# Altium PCB Dock_Chrgr.PcbDoc (part 1 of 2)
Units mil, origin at the board's own origin, x right, y up, seen from the top; angles counter-clockwise.
Board outline 3937.01 x 1574.8 mil, 2 copper layers (Top Layer, Bottom Layer); 76 components, 49 nets, 210 pads, 119 vias.
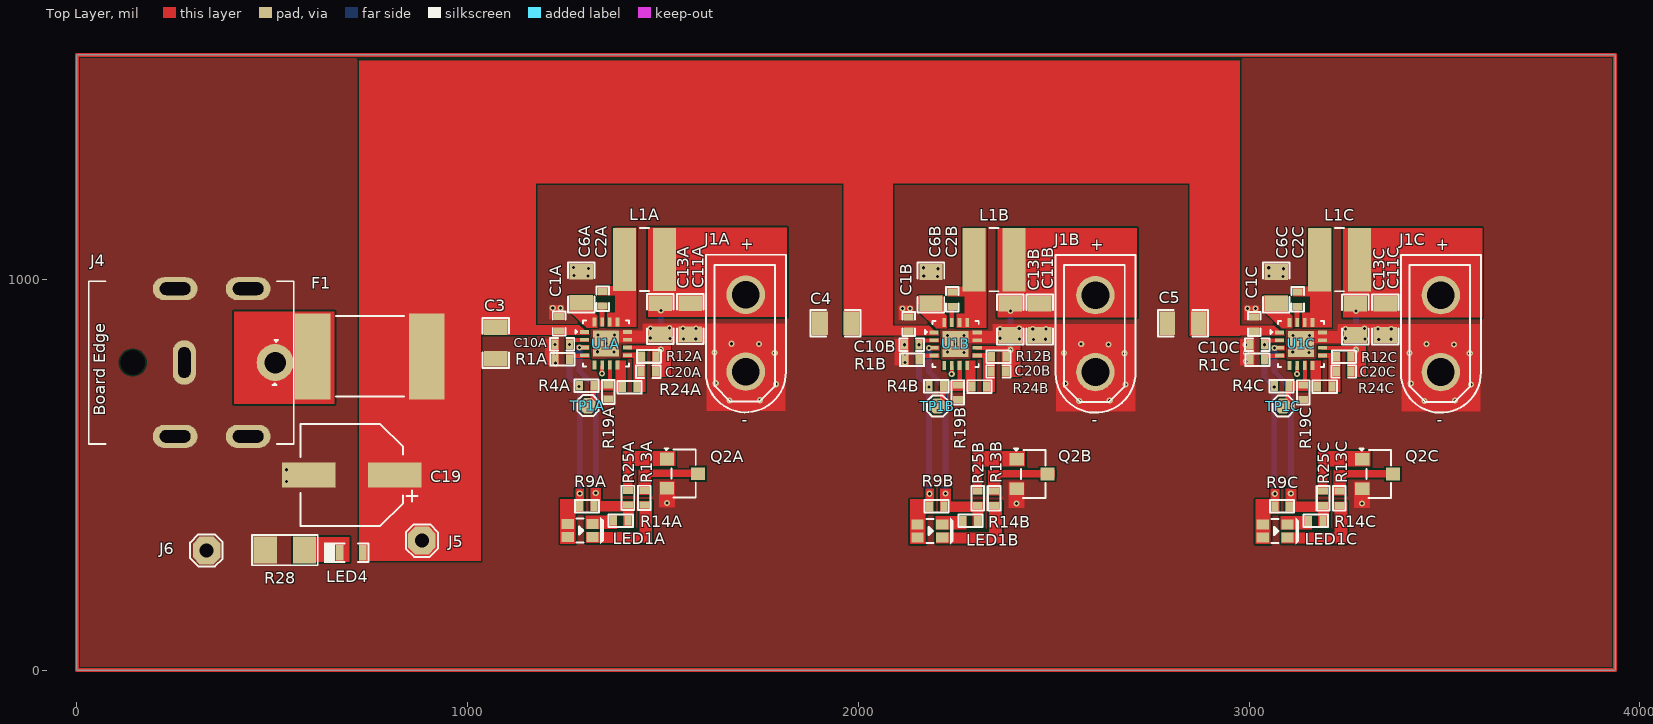
[diagram p0: Top Layer view]
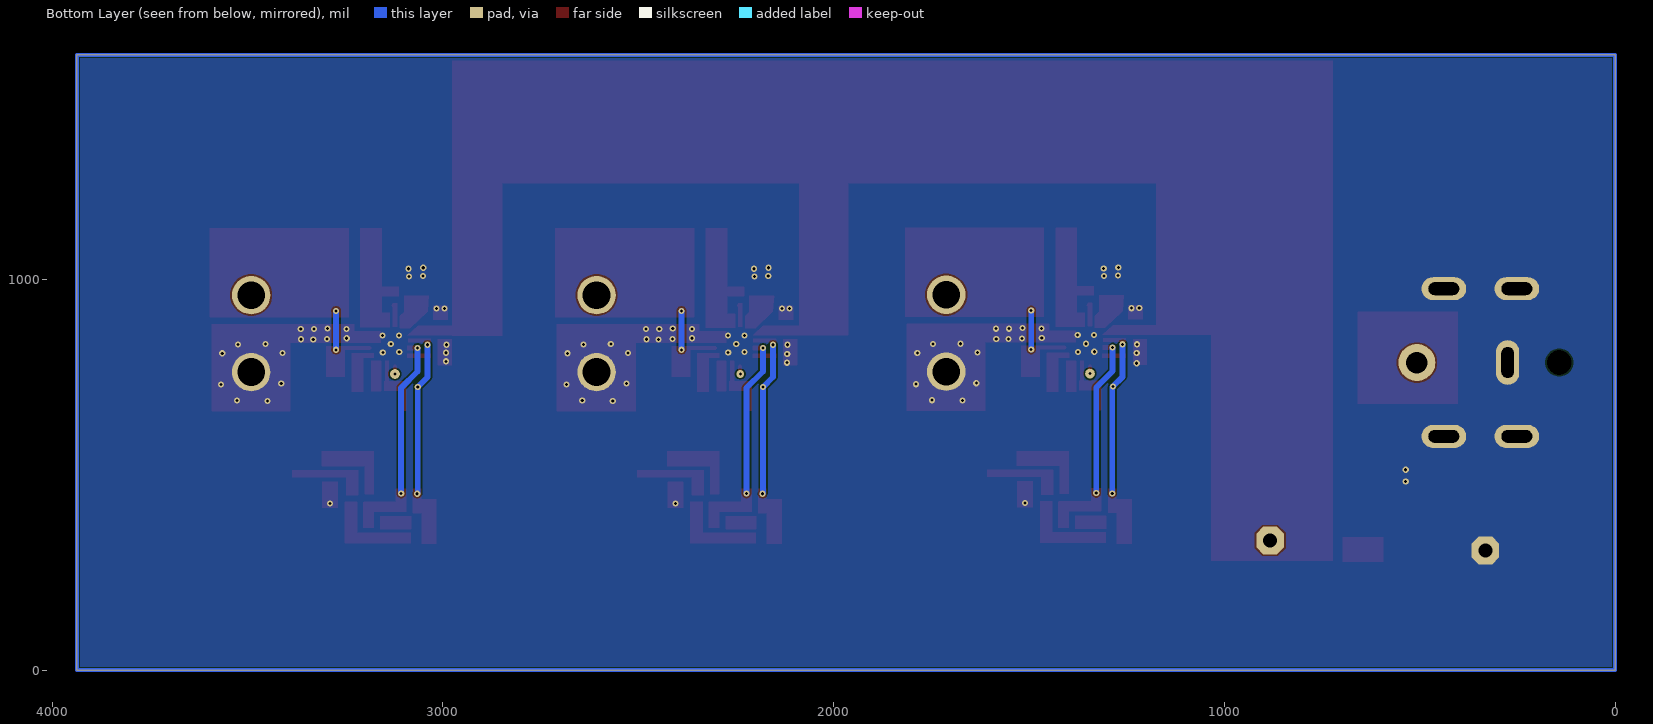
[diagram p1: Bottom Layer view, seen from below]
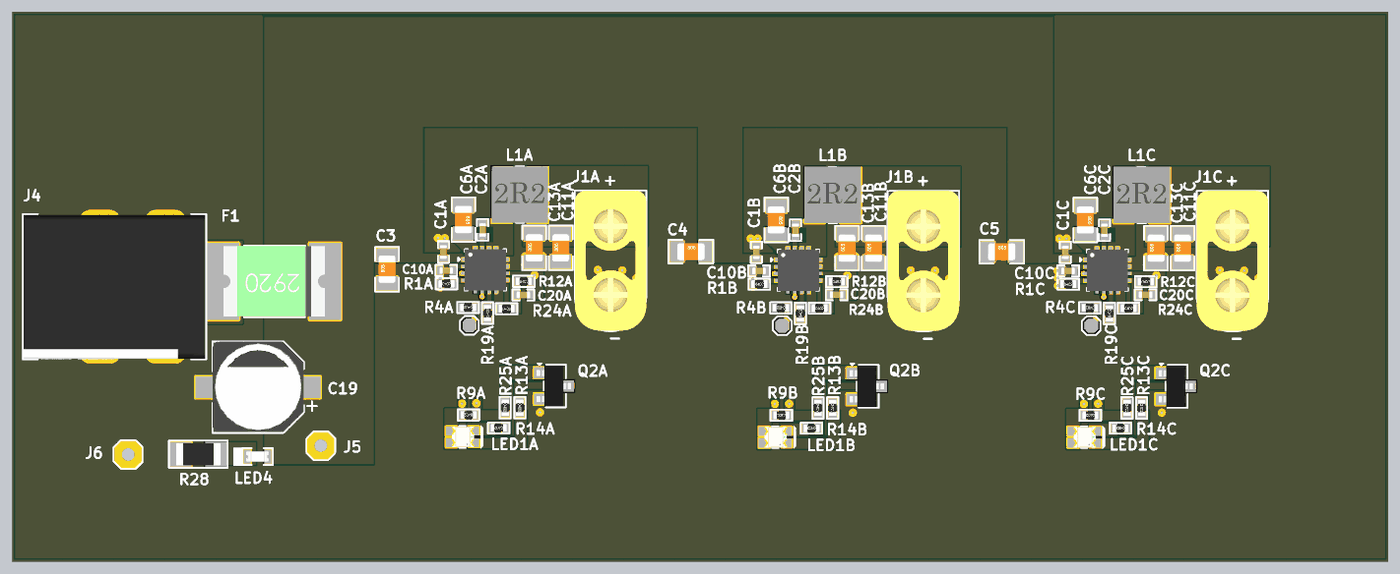
[diagram p2: 3D render of the assembled board from above, using the file's embedded part models]

## Layer stack, top to bottom
Top Solder: solder mask 0.4, Solder Resist, Dk 3.5
Top Layer: signal copper 1.4
Dielectric 1: dielectric 12.6, FR-4, Dk 4.8
Bottom Layer: signal copper 1.4
Bottom Solder: solder mask 0.4, Solder Resist, Dk 3.5

## Board outline
0,0 0,1574.8 3937.01,1574.8 3937.01,0

## Design rules (kind name [scope] priority, off if disabled: settings)
Clearance [All] p1: gap=4 ignorepadtopadclearanceinfootprint=FALSE except(0: Arc-Hole Track-Hole SMDPad-Hole THPad-Hole Via-Hole Fill-Hole Poly-Hole Region-Hole Text-Hole)
MinimumSolderMaskSliver [All] p1: minsoldermaskwidth=0
PolygonConnect [All] p1: connectstyle=Direct reliefconductorwidth=10 reliefentries=4 polygonreliefangle="90 Angle" airgapwidth=10
RoomDefinition U_Charger_Sheet11 [InComponentClass('U_Charger_Sheet11')] p1: confinementstyle=ConfineIn formatcopy=TRUE lockcomponents=FALSE outline 1093,1205.5 1909,1205.5 1909,258 1093,258
RoomDefinition U_Charger_Sheet12 [InComponentClass('U_Charger_Sheet12')] p2: confinementstyle=ConfineIn formatcopy=TRUE lockcomponents=FALSE outline 1988,1204.5 2804,1204.5 2804,257 1988,257
RoomDefinition U_Charger_Sheet13 [InComponentClass('U_Charger_Sheet13')] p3: confinementstyle=ConfineIn formatcopy=TRUE lockcomponents=FALSE outline 2872,1204.5 3688,1204.5 3688,257 2872,257
RoutingVias [All] p1: holewidth=28 width=50 viastyle="Through Hole" minholewidth=28 minwidth=50 maxholewidth=28 maxwidth=50
SilkToSilkClearance [All] p1: silktosilkclearance=0
SilkToSolderMaskClearance [IsPad] p1: minsilkscreentomaskgap=0.5 clearancetoexposedcopper=TRUE
SolderMaskExpansion [All] p1: expansion=4 istentingtop=FALSE
Width [All] p1: maxlimit=100 minlimit=4 preferedwidth=10 minimp=50.000000 maximp=50.000000 favimp=50.000000
27 further rules are at their usual default settings.

## Classes and differential pairs
channel class Charger_Sheet1: U_Charger_Sheet11 U_Charger_Sheet12 U_Charger_Sheet13
component class U_Charger_Sheet13: C1C C2C C6C C10C C11C C13C C20C J1C L1C LED1C Q2C R1C R4C R9C R12C R13C R14C R19C R24C R25C TP1C U1C
component class U_Charger_Sheet12: C1B C2B C6B C10B C11B C13B C20B J1B L1B LED1B Q2B R1B R4B R9B R12B R13B R14B R19B R24B R25B TP1B U1B
component class "U_Power input_Sheet": C3 C4 C5 C19 F1 J5 J6 LED4 R28
component class U_Charger_Sheet11: C1A C2A C6A C10A C11A C13A C20A J1A L1A LED1A Q2A R1A R4A R9A R12A R13A R14A R19A R24A R25A TP1A U1A

## Components (designator, comment, footprint, x,y, rotation, side; value= is the part's Value field where it differs from the comment)
C1A "2.2uf" Cap-0402 1234,887 r270 top (schematic designator C1)
C1B "2.2uf" Cap-0402 2129,886 r270 top (schematic designator C1)
C1C "2.2uf" Cap-0402 3013,886 r270 top (schematic designator C1)
C2A "47nF" Cap-0402 1346,950.5 r90 top (schematic designator C2)
C2B "47nF" Cap-0402 2241,949.5 r90 top (schematic designator C2)
C2C "47nF" Cap-0402 3125,949.5 r90 top (schematic designator C2)
C3 "22uF" Cap-0805 1072.5,837.5 r90 top
C4 "22uF" Cap-0805 1942,888 r0 top
C5 "22uF" Cap-0805 2831,887.5 r0 top
C6A "10uF" Cap-0805 1291,980 r270 top (schematic designator C6)
C6B "10uF" Cap-0805 2186,979 r270 top (schematic designator C6)
C6C "10uF" Cap-0805 3070,979 r270 top (schematic designator C6)
C10A "2.2uF" Cap-0402 1242,834 r180 top (schematic designator C10)
C10B "2.2uF" Cap-0402 2137,833 r180 top (schematic designator C10)
C10C "2.2uF" Cap-0402 3021,833 r180 top (schematic designator C10)
C11A "10uF" Cap-0805 1569.5,899 r90 top (schematic designator C11)
C11B "10uF" Cap-0805 2464.5,898 r90 top (schematic designator C11)
C11C "10uF" Cap-0805 3348.5,898 r90 top (schematic designator C11)
C13A "10uF" Cap-0805 1493.5,899 r90 top (schematic designator C13)
C13B "10uF" Cap-0805 2388.5,898 r90 top (schematic designator C13)
C13C "10uF" Cap-0805 3272.5,898 r90 top (schematic designator C13)
C19 "100uF" RVT1H101M0607 703.5,499.5 r180 top
C20A "470pF" Cap-0402 1462.5,764 r0 top (schematic designator C20)
C20B "470pF" Cap-0402 2358.5,764.5 r0 top (schematic designator C20)
C20C "470pF" Cap-0402 3242.5,764.5 r0 top (schematic designator C20)
F1 "SHV2920P500-30-AA" Fuse-2920 749.5,803 r0 top
J1A "XT30UPB-M" XT30UPB-M 1712,862.5 r90 top (schematic designator J1)
J1B "XT30UPB-M" XT30UPB-M 2607,861.5 r90 top (schematic designator J1)
J1C "XT30UPB-M" XT30UPB-M 3491,861.5 r90 top (schematic designator J1)
J4 "DC-053D-25A" DC-053D-25A 325.2,787.4 r90 top
J5 "Test Point -TH 1.8mm Hole size 0.92mm" "Test Point -TH 1.8mm Hole size 0.92mm" 883,332 r180 top
J6 "Test Point -TH 1.8mm Hole size 0.92mm" "Test Point -TH 1.8mm Hole size 0.92mm" 332,306.5 r90 top
L1A "2.2uH" XRTC404030S2R2MGCA 1452.5,1051.5 r0 top (schematic designator L1)
L1B "2.2uH" XRTC404030S2R2MGCA 2347.5,1050.5 r0 top (schematic designator L1)
L1C "2.2uH" XRTC404030S2R2MGCA 3231.5,1050.5 r0 top (schematic designator L1)
LED1A "Red,Blue" XL-1615SURUBC 1288.01,357.26 r180 top (schematic designator LED1)
LED1B "Red,Blue" XL-1615SURUBC 2183.01,356.26 r180 top (schematic designator LED1)
LED1C "Red,Blue" XL-1615SURUBC 3067.01,356.26 r180 top (schematic designator LED1)
LED4 "RED" LED-0603 702,300.5 r180 top
Q2A "YJL2302B" SOT-23-3L_ 1550,503 r270 top (schematic designator Q2)
Q2B "YJL2302B" SOT-23-3L_ 2445,502 r270 top (schematic designator Q2)
Q2C "YJL2302B" SOT-23-3L_ 3329,502 r270 top (schematic designator Q2)
R1A "20K" Res-0402 1242.5,796 r0 top (schematic designator R1)
R1B "20K" Res-0402 2137.5,795 r0 top (schematic designator R1)
R1C "20K" Res-0402 3021.5,795 r0 top (schematic designator R1)
R4A "5.23K" Res-0402 1304.5,728 r180 top value=5.23kR (schematic designator R4)
R4B "5.23K" Res-0402 2199.5,727 r180 top value=5.23kR (schematic designator R4)
R4C "5.23K" Res-0402 3083.5,727 r180 top value=5.23kR (schematic designator R4)
R9A "10K" Res-0402 1305.5,420 r180 top (schematic designator R9)
R9B "10K" Res-0402 2200.5,419 r180 top (schematic designator R9)
R9C "10K" Res-0402 3084.5,419 r180 top (schematic designator R9)
R12A "1.33M" Res-0402 1464,803 r0 top (schematic designator R12)
R12B "1.33M" Res-0402 2359,802 r0 top (schematic designator R12)
R12C "1.33M" Res-0402 3243,802 r0 top (schematic designator R12)
R13A "270R" Res-0402 1452.5,441 r270 top (schematic designator R13)
R13B "270R" Res-0402 2347.5,440 r270 top (schematic designator R13)
R13C "270R" Res-0402 3231.5,440 r270 top (schematic designator R13)
R14A "560R" Res-0402 1392,383 r180 top (schematic designator R14)
R14B "560R" Res-0402 2287,382 r180 top (schematic designator R14)
R14C "560R" Res-0402 3171,382 r180 top (schematic designator R14)
R19A "7.87K" Res-0402 1360,712 r90 top value=7.87kR (schematic designator R19)
R19B "7.87K" Res-0402 2255,711 r90 top value=7.87kR (schematic designator R19)
R19C "7.87K" Res-0402 3139,711 r90 top value=7.87kR (schematic designator R19)
R24A "200K" Res-0402 1414.5,724.5 r0 top (schematic designator R24)
R24B "200K" Res-0402 2310,726 r0 top (schematic designator R24)
R24C "200K" Res-0402 3194,726 r0 top (schematic designator R24)
R25A "1K" Res-0402 1410.5,441 r270 top (schematic designator R25)
R25B "1K" Res-0402 2305.5,440 r270 top (schematic designator R25)
R25C "1K" Res-0402 3189.5,440 r270 top (schematic designator R25)
R28 "1K" Res-1206 532.5,307.5 r0 top
TP1A "TEST POINT 0.5mm Dia" "Test-point - 0.5mm" 1308,677 r90 top (schematic designator TP1)
TP1B "TEST POINT 0.5mm Dia" "Test-point - 0.5mm" 2203,676 r90 top (schematic designator TP1)
TP1C "TEST POINT 0.5mm Dia" "Test-point - 0.5mm" 3087,676 r90 top (schematic designator TP1)
U1A "BQ25306RTER" "16-WQFN (3x3)" 1299.04,865.41 r0 top (schematic designator U1)
U1B "BQ25306RTER" "16-WQFN (3x3)" 2194.04,864.41 r0 top (schematic designator U1)
U1C "BQ25306RTER" "16-WQFN (3x3)" 3078.04,864.41 r0 top (schematic designator U1)

## Footprints (in the part's own frame and the unit in brackets; to place one, negate y for a bottom-side part, rotate by r counter-clockwise, add the part's x,y. Pads: shape width x height; smd on the part's side, far side on the other; paste and mask are expansions set on the pad)
"16-WQFN (3x3)" [mm]
  rect 0.6x0.24 smd mask+0.07: 1(0,0) 2(0,-0.5) 3(0,-1) 4(0,-1.5) 9(2.8,-1.5) 10(2.8,-1) 11(2.8,-0.5) 12(2.8,0)
  rect 0.24x0.6 smd mask+0.07: 5(0.65,-2.15) 6(1.15,-2.15) 7(1.65,-2.15) 8(2.15,-2.15) 13(2.15,0.65) 14(1.65,0.65) 15(1.15,0.65) 16(0.65,0.65)
  rect 1.68x1.68 smd mask+0.07: 17(1.4,-0.75)
  silkscreen extent -0.59,-2.25 2.9,0.75, body extent -0.1,-2.25 2.9,0.75, height 0.8
Cap-0402 [mil]
  rect 18x25 smd mask+2.36: 1(-18.5,0) 2(18.5,0)
  silkscreen extent -31,-16 31,16, body extent -20,-10 20,10, height 19
Cap-0805 [mil] "SMD 0805"
  rect 40x60 smd mask+2.76: 1(-40,0) 2(40,0)
  silkscreen extent -64,-34 64,34, body extent -39,-25 39,25, height 30
DC-053D-25A [mm]
  round 2.4 hole 1.4 mask+0.05: 1(0,-4.625)
  oval 2.9x1.5 hole 0.82 slot 2 at 0 deg mask+0.05: 2(0,1.275)
  oval 1.5x2.9 hole 0.82 slot 2 at 90 deg mask+0.05: 3(-4.8,-2.875) 3(-4.8,1.875) 3(4.8,-2.875) 3(4.8,1.875)
  round 0 hole 1.6 unplated mask+0.05: MH(0,4.625)
  silkscreen extent -5.28,-5.84 5.28,7.49, body extent -5.26,-5.78 5.25,7.42, height 10.2
Fuse-2920 [mm]
  rect 2.3x5.6 smd: 1(-3.7,0) 2(3.7,0)
  silkscreen extent -2.18,-2.62 2.24,2.62, body extent -3.68,-2.56 3.68,2.56, height 0.9
LED-0603 [mm]
  rect 0.5x1 smd: 1(-0.75,0) 2(0.75,0)
  silkscreen extent -1.12,-0.66 1.75,0.66, body extent -0.82,-0.37 0.82,0.36, height 0.68
Res-0402 [mil]
  rect 18x25 smd mask+2.17: 1(-18.5,0) 2(18.5,0)
  silkscreen extent -32,-17 32,16, body extent -23,-11 23,11, height 16
Res-1206 [mil]
  rect 60x70 smd: 1(-50,0) 2(50,0)
  silkscreen extent -84,-39 84,39, body extent -63,-31 63,31, height 24
RVT1H101M0607 [mm]
  rect 3.5x1.6 smd: 1(-2.8,0) 2(2.8,0)
  silkscreen extent -4.27,-3.33 3.32,3.33, body extent -3.31,-3.33 3.29,3.27, height 7.94
SOT-23-3L_ [mm]
  rect 0.82x0.92 smd: 1(-0.95,-1) 2(0.95,-1) 3(0,1)
  silkscreen extent -1.65,-1.17 1.56,0.86, body extent -1.5,-1.25 1.5,1.25, height 1.1
"Test Point -TH 1.8mm Hole size 0.92mm" [mm]
  oct 1.8x1.8 hole 0.92: 1(0,0)
  silkscreen extent -1.04,-1.04 1.04,1.07
"Test-point - 0.5mm" [mm]
  oct 1x1 smd: 1(0,0)
  silkscreen extent -0.68,-0.68 0.68,0.68
XL-1615SURUBC [mm]
  rect 0.8x0.65 smd: 1(-0.8,0.425) 2(-0.8,-0.425) 3(0.8,-0.425) 4(0.8,0.425)
  silkscreen extent -1.52,-0.86 0.23,0.86, body extent -0.85,-0.76 0.77,0.75, height 0.59
XRTC404030S2R2MGCA [mm]
  rect 1.5x4.1 smd: 1(-1.3,0) 2(1.3,0)
  silkscreen extent -0.3,-2.05 0.3,2.05, body extent -2.05,-2.05 2.05,2.05, height 3
XT30UPB-M [mm]
  round 2.5 hole 1.8 paste+0 mask+0.051: 1(-2.5,0) 2(2.5,0)
  silkscreen extent -5.14,-2.6 5.1,2.6, body extent -5.1,-2.6 5.1,2.6, height 10.7

## Part data
C1A C1B C1C: library part GRM155R61E225KE11D, "CAP CER 2.2UF 25V X5R 0402", Capacitance=2.2uF, Case Code (Imperial)=0402, Case Code (Metric)=1005, Dielectric=X5R, LCSC Part Number=C385032, Manufacturer=Murata, Max Operating Temperature=85°C, Min Operating Temperature=-55°C, Package Quantity=10000, Resistor Type=Ceramic, Tolerance=10%, Voltage Rating=25V, Case/Package=0402, Category="Ceramic Capacitors", ComponentLink1Description=http://www.mouser.com/ds/2/281/c02e-2905.pdf?src-supplier=Mouser, ComponentLink1URL=http://www.mouser.com/ds/2/281/c02e-2905.pdf?src-supplier=Mouser, ComponentLink2Description=http://search.murata.co.jp/Ceramy/image/img/A01X/G101/ENG/GRM155R61E225KE11-01.pdf?src-supplier=Digi-Key, ComponentLink2URL=http://search.murata.co.jp/Ceramy/image/img/A01X/G101/ENG/GRM155R61E225KE11-01.pdf?src-supplier=Digi-Key, ComponentLink3Description=http://search.murata.co.jp/Ceramy/image/img/A01X/partnumbering_e_01.pdf?src-supplier=Digi-Key, ComponentLink3URL=http://search.murata.co.jp/Ceramy/image/img/A01X/partnumbering_e_01.pdf?src-supplier=Digi-Key, ComponentLink4Description=http://psearch.en.murata.com/capacitor/product/GRM155R61E225KE11%23.pdf?src-supplier=Avnet, ComponentLink4URL=http://psearch.en.murata.com/capacitor/product/GRM155R61E225KE11%23.pdf?src-supplier=Avnet, Height=0.5mm, Item Type=Capacitor, Lead Free="Lead Free", Length=1mm, Manufacturer Part Number=GRM155R61E225KE11D, Material=Ceramic, Mount="Surface Mount", Packaging="Tape and Reel", Pricing 1="10000=0.03830, 20000=0.03623, 40000=0.03416, 60000=0.03209, 80000=0.03002, 100000=0.02795, 1000000=0.02588 (USD)", RoHS=Yes, RoHS Compliant=Yes, Stock 1=210000, Supplier 1=Avnet, Supplier Part Number 1=GRM155R61E225KE11D, Termination=SMD/SMT, Thickness=0.022inch, Voltage Rating (DC)=25V, Weight=0.000212oz, Width=0.5mm
C2A C2B C2C: library part GRM155R71E473KA88D, "CAP CER 0.047UF 25V X7R 0402", Case Code (Imperial)=0402, Case Code (Metric)=1005, Dielectric=X7R, LCSC Part Number=C77017, Manufacturer=Murata, Max Operating Temperature=125°C, Min Operating Temperature=-55°C, Package Quantity=1, Supplier Part Number 1=2478015P, Tolerance=10%, Voltage=25V, Case/Package=0402, Category="Ceramic Capacitors", ComponentLink1Description=https://datasheet.ciiva.com/34302/1856425-34302854.pdf?src-supplier=Jameco, ComponentLink1URL=https://datasheet.ciiva.com/34302/1856425-34302854.pdf?src-supplier=Jameco, ComponentLink2Description=https://datasheet.ciiva.com/131/grm155r71e473ka88-01-131494.pdf?src-supplier=Digi-Key, ComponentLink2URL=https://datasheet.ciiva.com/131/grm155r71e473ka88-01-131494.pdf?src-supplier=Digi-Key, ComponentLink3Description=https://datasheet.ciiva.com/18184/getdatasheetpartid-153136-18184712.pdf?src-supplier=Verical, ComponentLink3URL=https://datasheet.ciiva.com/18184/getdatasheetpartid-153136-18184712.pdf?src-supplier=Verical, ComponentLink4Description=https://datasheet.ciiva.com/29199/454180-da-01-en-vs-kondensator-0402-29199826.pdf?src-supplier=Conrad, ComponentLink4URL=https://datasheet.ciiva.com/29199/454180-da-01-en-vs-kondensator-0402-29199826.pdf?src-supplier=Conrad, ComponentLink5Description=https://datasheet.ciiva.com/14103/grmseries-highdielectrictype-eng-14103754.pdf?src-supplier=Distrelec, ComponentLink5URL=https://datasheet.ciiva.com/14103/grmseries-highdielectrictype-eng-14103754.pdf?src-supplier=Distrelec, ComponentLink6Description=https://datasheet.ciiva.com/7937/608985-7937623.pdf?src-supplier=Element14, ComponentLink6URL=https://datasheet.ciiva.com/7937/608985-7937623.pdf?src-supplier=Element14, ComponentLink7Description=https://datasheet.ciiva.com/131/grm155r71e473ka88-01-131493.pdf?src-supplier=Digi-Key, ComponentLink7URL=https://datasheet.ciiva.com/131/grm155r71e473ka88-01-131493.pdf?src-supplier=Digi-Key, ComponentLink8Description=https://datasheet.ciiva.com/131/grm155r71e473ka88-01-131492.pdf?src-supplier=Digi-Key, ComponentLink8URL=https://datasheet.ciiva.com/131/grm155r71e473ka88-01-131492.pdf?src-supplier=Digi-Key, ComponentLink9Description=https://datasheet.ciiva.com/5424/product-5424844.pdf?src-supplier=Mouser, ComponentLink9URL=https://datasheet.ciiva.com/5424/product-5424844.pdf?src-supplier=Mouser, ComponentLink10Description=https://datasheet.ciiva.com/2989/product-2989395.pdf?src-supplier=Avnet, ComponentLink10URL=https://datasheet.ciiva.com/2989/product-2989395.pdf?src-supplier=Avnet, ComponentLink11Description=https://datasheet.ciiva.com/16213/product-16213823.pdf?src-supplier=Future+Electronics, ComponentLink11URL=https://datasheet.ciiva.com/16213/product-16213823.pdf?src-supplier=Future+Electronics, Construction=Flat, Depth=0.5mm, Height=0.5mm, Item Type=Capacitor, Lead Free="Lead Free", Length=1mm, Manufacturer Part Number=GRM155R71E473KA88D, Material=Ceramic, Mounting Technology="Surface Mount", Packaging="Tape and Reel", Pins=2, Pricing 1="1000=0.00007, 8000=0.00900 (GBP)", Radiation Hardening=No, Reach SVHC Compliant=Yes, RoHS=Yes, RoHS Compliant=Yes, Series=GRM, Stock 1=10000, Supplier 1=Rs, Termination=SMD/SMT, Thickness=0.022inch, Voltage Rating=25V, Voltage Rating (DC)=25V, Width=0.02inch
C3 C4 C5: library part GRM21BR61E226ME44L, "CAP CER 22UF 25V X5R 0805", Case Code (Imperial)=0805, Case Code (Metric)=2012, Dielectric=X5R, LCSC Part Number=C86816, Manufacturer=Murata, Max Operating Temperature=85°C, Min Operating Temperature=-55°C, Package Quantity=3000, Resistor Type=Ceramic, Tolerance=20%, Voltage=25V, Capacitance=22uF, Case/Package=0805, Category="Ceramic Capacitors", ComponentLink1Description=https://datasheet.ciiva.com/22787/1747471-22787265.pdf?src-supplier=Farnell, ComponentLink1URL=https://datasheet.ciiva.com/22787/1747471-22787265.pdf?src-supplier=Farnell, ComponentLink2Description=https://datasheet.ciiva.com/7719/1747471-7719095.pdf?src-supplier=Element14, ComponentLink2URL=https://datasheet.ciiva.com/7719/1747471-7719095.pdf?src-supplier=Element14, ComponentLink3Description=https://datasheet.ciiva.com/28584/1747471-28584199.pdf?src-supplier=Element14, ComponentLink3URL=https://datasheet.ciiva.com/28584/1747471-28584199.pdf?src-supplier=Element14, Construction=Flat, Depth=1.25mm, Height=1.25mm, Item Type=Capacitor, Lead Free="Lead Free", Length=2mm, Manufacturer Part Number=GRM21BR61E226ME44L, Material=Ceramic, Mount="Surface Mount", Packaging="Tape and Reel", Pricing 1="1=0.45930, 10=0.35000, 25=0.33950, 50=0.26910, 100=0.22090, 250=0.21320, 500=0.16760, 1000=0.14640, 3000=0.11710, 6000=0.10550, 15000=0.10450 (USD)", REACH SVHC="No SVHC", RoHS=Yes, RoHS Compliant=Yes, Series=GRM, Stock 1=21193, Supplier 1="Arrow Electronics", Supplier Part Number 1=GRM21BR61E226ME44L, Termination=SMD/SMT, Thickness=0.057inch, Voltage Rating=25V, Voltage Rating (DC)=25V, Weight=0.000335oz, Width=1.25mm
C6A C6B C6C: library part CC0805KKX5R8BB106, "CAP CER 10UF 25V X5R 0805", Case Code (Imperial)=0805, Case Code (Metric)=2012, Dielectric=X5R, LCSC Part Number=C89831, Manufacturer=Yageo, Max Operating Temperature=85°C, Min Operating Temperature=-55°C, Resistor Type=Ceramic, Supplier Part Number 1=311-1869-1-ND, Tolerance=10%, Voltage Rating=25V, Capacitance=10uF, Case/Package=0805, Category="Ceramic Capacitors", ComponentLink1Description=http://www.mouser.com/ds/2/447/UPY-GPHC_X5R_4V-to-50V_25-1131599.pdf?src-supplier=Mouser, ComponentLink1URL=http://www.mouser.com/ds/2/447/UPY-GPHC_X5R_4V-to-50V_25-1131599.pdf?src-supplier=Mouser, ComponentLink2Description=http://www.yageo.com/documents/recent/UPY-GPHC_X5R_4V-to-50V_25.pdf?src-supplier=Digi-Key, ComponentLink2URL=http://www.yageo.com/documents/recent/UPY-GPHC_X5R_4V-to-50V_25.pdf?src-supplier=Digi-Key, Depth=1.25mm, Halogen Free="Halogen Free", Item Type=Capacitor, Lead Free="Lead Free", Length=0.079inch, Manufacturer Part Number=CC0805KKX5R8BB106, Mount="Surface Mount", Packaging="Tape and Reel", Pricing 1="1=0.31000, 10=0.21200, 50=0.14820, 100=0.12710, 500=0.09534, 1000=0.08050 (USD)", RoHS=Yes, RoHS Compliant=Yes, Series=CC, Stock 1=554290, Supplier 1=Digi-Key, Termination=SMD/SMT, Thickness=0.057inch, Voltage Rating (DC)=25V, Weight=0.000194oz, Width=0.049inch
C10A C10B C10C: library part GRM155R61C225KE11D, "CAP CER 2.2UF 16V X5R 0402", Case Code (Imperial)=0402, Case Code (Metric)=1005, LCSC Part Number=C88944, Manufacturer=Murata, Max Operating Temperature=85°C, Min Operating Temperature=-55°C, Tolerance=10%, Voltage Rating=16V, Case/Package=0402, ComponentLink1Description=http://www.mouser.com/ds/2/281/c02e-2905.pdf?src-supplier=Mouser, ComponentLink1URL=http://www.mouser.com/ds/2/281/c02e-2905.pdf?src-supplier=Mouser, ComponentLink2Description=https://datasheet.octopart.com/GRM155R61C225KE11D-Murata-datasheet-149522998.pdf?src-supplier=Newark, ComponentLink2URL=https://datasheet.octopart.com/GRM155R61C225KE11D-Murata-datasheet-149522998.pdf?src-supplier=Newark, ComponentLink3Description=https://datasheet.octopart.com/GRM155R61C225KE11D-Murata-datasheet-66001083.pdf?src-supplier=Future+Electronics, ComponentLink3URL=https://datasheet.octopart.com/GRM155R61C225KE11D-Murata-datasheet-66001083.pdf?src-supplier=Future+Electronics, ComponentLink4Description=https://search.murata.co.jp/Ceramy/image/img/A01X/G101/ENG/GRM155R61C225KE11-01.pdf?src-supplier=Digikey, ComponentLink4URL=https://search.murata.co.jp/Ceramy/image/img/A01X/G101/ENG/GRM155R61C225KE11-01.pdf?src-supplier=Digikey, ComponentLink5Description=https://datasheet.octopart.com/GRM155R61C225KE11D-Murata-datasheet-165579666.pdf?src-supplier=TME, ComponentLink5URL=https://datasheet.octopart.com/GRM155R61C225KE11D-Murata-datasheet-165579666.pdf?src-supplier=TME, Height=0.3mm, Item Type=Capacitors, Lead Free="Lead Free", Length=0.039inch, Manufacturer Part Number=GRM155R61C225KE11D, Material=Ceramic, Mounting Technology="Surface Mount", Packaging="Cut Tape", Pricing="10000=0.0294, 20000=0.0289, 30000=0.0287, 40000=0.0285, 50000=0.0279 (USD)", RoHS=Yes, RoHS Compliant=Yes, Series=GRM, Stock=80000, Supplier="Future Electronics", Thickness=0.022inch, Voltage Rating (DC)=16V, Width=0.02inch
C11A C11B C11C C13A C13B C13C: library part EMK212BB7106MG-T, "CAP CER 10UF 16V X7R 0805", Case Code (Imperial)=0805, Case Code (Metric)=2012, Dielectric=X7R, LCSC Part Number=C141287, Manufacturer="Taiyo Yuden", Max Operating Temperature=125°C, Min Operating Temperature=-55°C, Package Quantity=3000, Ratings=AEC-Q200, Resistor Type=Ceramic, Supplier Part Number 1=587-3319-1-ND, Tolerance=20%, Voltage Rating=16V, Capacitance=10uF, Case/Package=0805, Category="Ceramic Capacitors", ComponentLink1Description=https://datasheet.ciiva.com/24393/472emk212bb7106mg-t-24393497.pdf?src-supplier=Onlinecomponents.com, ComponentLink1URL=https://datasheet.ciiva.com/24393/472emk212bb7106mg-t-24393497.pdf?src-supplier=Onlinecomponents.com, ComponentLink2Description=https://datasheet.ciiva.com/30229/379emk212bb7106mg-t-30229719.pdf?src-supplier=Onlinecomponents.com, ComponentLink2URL=https://datasheet.ciiva.com/30229/379emk212bb7106mg-t-30229719.pdf?src-supplier=Onlinecomponents.com, ComponentLink3Description=https://datasheet.ciiva.com/18697/mlcc-all-e-18697736.pdf?src-supplier=Digi-Key, ComponentLink3URL=https://datasheet.ciiva.com/18697/mlcc-all-e-18697736.pdf?src-supplier=Digi-Key, ComponentLink4Description=https://datasheet.ciiva.com/18697/mlcc-all-e-18697735.pdf?src-supplier=Digi-Key, ComponentLink4URL=https://datasheet.ciiva.com/18697/mlcc-all-e-18697735.pdf?src-supplier=Digi-Key, ComponentLink5Description=https://datasheet.ciiva.com/18697/mlcc-all-e-18697737.pdf?src-supplier=Digi-Key, ComponentLink5URL=https://datasheet.ciiva.com/18697/mlcc-all-e-18697737.pdf?src-supplier=Digi-Key, ComponentLink6Description=https://datasheet.ciiva.com/15376/mlcc01-e-15376088.pdf?src-supplier=Mouser, ComponentLink6URL=https://datasheet.ciiva.com/15376/mlcc01-e-15376088.pdf?src-supplier=Mouser, Halogen Free="Halogen Free", Height=1.25mm, Item Type=Capacitor, Length=2mm, Manufacturer Part Number=EMK212BB7106MG-T, Mount="Surface Mount", Packaging="Tape and Reel", Pricing 1="1=0.40000, 10=0.28000, 50=0.19620, 100=0.16820, 500=0.12612, 1000=0.10650 (USD)", RoHS=Yes, RoHS Compliant=Yes, Stock 1=896107, Supplier 1=Digi-Key, Termination=SMD/SMT, Thickness=0.053inch, Voltage Rating (DC)=16V, Width=0.049inch
C19: library part RVT1H101M0607, "100uF 50V ±20% SMD,D6.3xL7.7mm Aluminum Electrolytic Capacitors - SMD ROHS", LCSC Part Number=C3151829, Manufacturer=ROQANG, Package=SMD,D6.3xL7.7mm, ComponentLink1Description=LCSC, ComponentLink1URL=https://www.lcsc.com/product-detail/Aluminum-Electrolytic-Capacitors-SMD_ROQANG-RVT1H101M0607_C3151829.html, Item Type=Capacitor, Manufacturer Part Number=RVT1H101M0607
C20A C20B C20C: library part GCM155R71H471KA37D, "CAP CER 470PF 50V X7R 0402", Case Code (Imperial)=0402, Case Code (Metric)=1005, Dielectric=X7R, LCSC Part Number=C85859, Manufacturer=Murata, Max Operating Temperature=125°C, Min Operating Temperature=-55°C, Package Quantity=1, Ratings=AEC-Q200, Tolerance=10%, Voltage Rating=50V, Case/Package=0402, ComponentLink1Description=https://datasheet.ciiva.com/131/product-131838.pdf?src-supplier=Digikey, ComponentLink1URL=https://datasheet.ciiva.com/131/product-131838.pdf?src-supplier=Digikey, ComponentLink2Description=https://datasheet.ciiva.com/131/product-131837.pdf?src-supplier=Digikey, ComponentLink2URL=https://datasheet.ciiva.com/131/product-131837.pdf?src-supplier=Digikey, ComponentLink3Description=https://datasheet.ciiva.com/131/product-131839.pdf?src-supplier=Digikey, ComponentLink3URL=https://datasheet.ciiva.com/131/product-131839.pdf?src-supplier=Digikey, ComponentLink4Description=https://datasheet.ciiva.com/11604/product-11604535.pdf?src-supplier=Avnet, ComponentLink4URL=https://datasheet.ciiva.com/11604/product-11604535.pdf?src-supplier=Avnet, Construction=Flat, Depth=0.5mm, Height=0.5mm, Item Type=Capacitors, Length=0.039inch, Manufacturer Part Number=GCM155R71H471KA37D, Material=4241ConductorMaterial, Mounting Technology="Surface Mount", Packaging="Tape and Reel", Pricing="100=0.197, 500=0.175, 5000=0.11 (SEK)", Radiation Hardening=No, RoHS=Yes, RoHS Compliant=Yes, Series=GCM, Stock=7200, Supplier=Rs, Termination=SMD/SMT, Thickness=0.022inch, Voltage Rating (DC)=50V, Width=0.02inch
F1: "30V 5A 5A 2920 Resettable Fuses ROHS", LCSC Part Number=C495350, Manufacturer="PTTC(Polytronics Tech)", Package=2920, ComponentLink1Description=LCSC, ComponentLink1URL=https://www.lcsc.com/product-detail/Resettable-Fuses_PTTC-Polytronics-Tech-SHV2920P500-30-AA_C495350.html, Item Type=Fuse, Manufacturer Part Number=SHV2920P500-30-AA
J1A J1B J1C: "Plug", LCSC Part Number=C428721, Manufacturer="Changzhou Amass Elec", Package=-, ComponentLink1Description=LCSC, ComponentLink1URL=https://www.lcsc.com/product-detail/plug_Changzhou-Amass-Elec-XT30UPB-M_C428721.html, Item Type=Plug, Manufacturer Part Number=XT30UPB-M
J4: "Shrouded DC Power Receptacle -20℃~+70℃ 2.5mm 6.5mm 10A 16V Plugin AC/DC Power Connectors ROHS", LCSC Part Number=C2686352, Manufacturer="Korean Hroparts Elec", Package=Custom, ComponentLink1Description=LCSC, ComponentLink1URL=https://www.lcsc.com/product-detail/AC-DC-Power-Connectors_Korean-Hroparts-Elec-DC-053D-25A_C2686352.html, Item Type="DC JACK", Manufacturer Part Number=DC-053D-25A
L1A L1B L1C: library part XRTC404030S2R2MGCA, "9A 2.2uH ±20% 10.5A SMD,4x4mm Power Inductors ROHS  IR 19/22mOhm", LCSC Part Number=C39846868, Manufacturer=XR, Package=SMD,4x4mm, ComponentLink1Description=LCSC, ComponentLink1URL=https://www.lcsc.com/product-detail/Power-Inductors_XR-XRTC404030S2R2MGCA_C39846868.html, Item Type=Inductors, Manufacturer Part Number=XRTC404030S2R2MGCA
LED1A LED1B LED1C: library part XL-1615SURUBC, "20mA Colorless Transparent Lens -20℃~+85℃ Positive Stick Common Anode Red,Blue 120° 0606 LED Indication - Discrete ROHS", LCSC Part Number=C965836, Manufacturer=XINGLIGHT, Package=0805, ComponentLink1Description=LCSC, ComponentLink1URL=https://www.lcsc.com/product-detail/LED-Indication-Discrete_XINGLIGHT-XL-1615SURUBC_C965836.html, Item Type=LED, Manufacture Part Number=XL-1615SURUBC
LED4: library part NCD0603R3, "RED LED 0603 Light Emitting Diodes", LCSC Part Number=C3151730, Manufacturer="Foshan NationStar Optoelectronics", Package=0603, ComponentLink1Description=LCSC, ComponentLink1URL=https://www.lcsc.com/product-detail/Light-Emitting-Diodes-LED_Foshan-NationStar-Optoelectronics-NCD0603R3_C3151730.html, Item Type=LED, Manufacturer Part Number=NCD0603R3
Q2A Q2B Q2C: "20V 3A 40mΩ@4.5V,3A 700mW 780mV@250uA 29pF@10V N Channel 280pF@10V 2.9nC@4.5V -55℃~+150℃@(Tj) SOT-23-3L MOSFETs ROHS", LCSC Part Number=C699316, Manufacturer="Yangzhou Yangjie Elec Tech", Package=SOT-23-3L, ComponentLink1Description=LCSC, ComponentLink1URL=https://lcsc.com/product-detail/MOSFETs_Yangzhou-Yangjie-Elec-Tech-YJL2302B_C699316.html, Item Type=Mosfet, Manufacturer Part Number=YJL2302B
R1A R1B R1C: library part RC0402FR-0720KL, "RES 20K OHM 1% 1/16W 0402", Case Code (Imperial)=0402, Case Code (Metric)=1005, LCSC Part Number=C93942, Manufacturer=Yageo, Max Operating Temperature=155°C, Max Power Dissipation=63mW, Min Operating Temperature=-55°C, Package Quantity=1, Power Rating=62.5mW, Resistance=20kR, Resistance Tolerance=1%, Resistor Type="Thick Film", Temperature Coefficient=100ppm/°C, Voltage Rating=50V, Case/Package=0402, Category="Chip SMD Resistors", ComponentLink1Description=https://datasheet.ciiva.com/11808/0900766b80c66297-11808454.pdf?src-supplier=RSComponents, ComponentLink1URL=https://datasheet.ciiva.com/11808/0900766b80c66297-11808454.pdf?src-supplier=RSComponents, ComponentLink2Description=https://datasheet.ciiva.com/7983/1018594-7983511.pdf?src-supplier=Element14, ComponentLink2URL=https://datasheet.ciiva.com/7983/1018594-7983511.pdf?src-supplier=Element14, ComponentLink3Description=https://datasheet.ciiva.com/46394/1018594-46394974.pdf?src-supplier=Element14, ComponentLink3URL=https://datasheet.ciiva.com/46394/1018594-46394974.pdf?src-supplier=Element14, ComponentLink4Description=https://datasheet.ciiva.com/2453/pyu-r-int-thick-7-2453494.pdf?src-supplier=Digi-Key, ComponentLink4URL=https://datasheet.ciiva.com/2453/pyu-r-int-thick-7-2453494.pdf?src-supplier=Digi-Key, ComponentLink5Description=https://datasheet.ciiva.com/2453/pyu-r-int-thick-7-2453495.pdf?src-supplier=Digi-Key, ComponentLink5URL=https://datasheet.ciiva.com/2453/pyu-r-int-thick-7-2453495.pdf?src-supplier=Digi-Key, ComponentLink6Description=https://datasheet.ciiva.com/2453/pyu-r-int-thick-7-2453493.pdf?src-supplier=Digi-Key, ComponentLink6URL=https://datasheet.ciiva.com/2453/pyu-r-int-thick-7-2453493.pdf?src-supplier=Digi-Key, ComponentLink7Description=https://datasheet.ciiva.com/12558/pyu-rc0402-51-rohs-l-6-r-8721-12558796.pdf?src-supplier=Mouser, ComponentLink7URL=https://datasheet.ciiva.com/12558/pyu-rc0402-51-rohs-l-6-r-8721-12558796.pdf?src-supplier=Mouser, Construction=Rectangular, Depth=0.5mm, Features="Moisture Resistant", Height=0.016inch, Item Type=Resistor, Lead Free="Lead Free", Length=1mm, Manufacturer Part Number=RC0402FR-0720KL, Military Standard=Not, Number of Pins=2, Number of Terminations=2, Packaging="Tape and Reel", Pricing 1="10000=0.00085 (USD)", Reach SVHC Compliant=Yes, RoHS=Yes, RoHS Compliant=Yes, Series=RC, Size Code=0402, Stock 1=1960708, Supplier 1=Avnet, Supplier Part Number 1=RC0402FR-0720KL, Technology="THICK FILM", Termination=SMD/SMT, Tolerance=1%, Voltage Rating (DC)=50V, Width=0.02inch
R4A R4B R4C: library part CRCW04025K23FKED, "RES SMD 5.23K OHM 1% 1/16W 0402", Case Code (Imperial)=0402, Case Code (Metric)=1005, LCSC Part Number=C2076550, Manufacturer=Vishay, Max Operating Temperature=155°C, Max Power Dissipation=63mW, Min Operating Temperature=-55°C, Package Quantity=10, Resistance Tolerance=1%, Resistor Type="Thick Film", Temperature Coefficient=100ppm/°C, Voltage Rating=50V, Case/Package=0402, ComponentLink1Description=https://datasheet.ciiva.com/7679/1697337-7679068.pdf?src-supplier=Element14, ComponentLink1URL=https://datasheet.ciiva.com/7679/1697337-7679068.pdf?src-supplier=Element14, ComponentLink2Description=https://datasheet.ciiva.com/22702/1697337-22702815.pdf?src-supplier=Element14, ComponentLink2URL=https://datasheet.ciiva.com/22702/1697337-22702815.pdf?src-supplier=Element14, ComponentLink3Description=https://datasheet.ciiva.com/2463/dcrcwe3-2463422.pdf?src-supplier=Digikey, ComponentLink3URL=https://datasheet.ciiva.com/2463/dcrcwe3-2463422.pdf?src-supplier=Digikey, ComponentLink4Description=https://datasheet.ciiva.com/6051/125364-6051350.pdf?src-supplier=Farnell, ComponentLink4URL=https://datasheet.ciiva.com/6051/125364-6051350.pdf?src-supplier=Farnell, ComponentLink5Description=https://datasheet.ciiva.com/7743/125364-7743706.pdf?src-supplier=Element14, ComponentLink5URL=https://datasheet.ciiva.com/7743/125364-7743706.pdf?src-supplier=Element14, ComponentLink6Description=https://datasheet.ciiva.com/7679/1697337-7679069.pdf?src-supplier=Element14, ComponentLink6URL=https://datasheet.ciiva.com/7679/1697337-7679069.pdf?src-supplier=Element14, ComponentLink7Description=https://datasheet.ciiva.com/2463/dcrcwe3-2463423.pdf?src-supplier=Digikey, ComponentLink7URL=https://datasheet.ciiva.com/2463/dcrcwe3-2463423.pdf?src-supplier=Digikey, ComponentLink8Description=https://datasheet.ciiva.com/2463/dcrcwe3-2463421.pdf?src-supplier=Digikey, ComponentLink8URL=https://datasheet.ciiva.com/2463/dcrcwe3-2463421.pdf?src-supplier=Digikey, ComponentLink9Description=https://datasheet.ciiva.com/16767/70201119-16767021.pdf?src-supplier=Allied+Electronics, ComponentLink9URL=https://datasheet.ciiva.com/16767/70201119-16767021.pdf?src-supplier=Allied+Electronics, ComponentLink10Description=https://datasheet.ciiva.com/22869/70201119-22869546.pdf?src-supplier=Allied+Electronics, ComponentLink10URL=https://datasheet.ciiva.com/22869/70201119-22869546.pdf?src-supplier=Allied+Electronics, ComponentLink11Description=https://datasheet.ciiva.com/3256/dcrcwe3-3256686.pdf?src-supplier=Avnet, ComponentLink11URL=https://datasheet.ciiva.com/3256/dcrcwe3-3256686.pdf?src-supplier=Avnet, ComponentLink12Description=https://datasheet.ciiva.com/16200/dcrcwe3-16200567.pdf?src-supplier=Future+Electronics, ComponentLink12URL=https://datasheet.ciiva.com/16200/dcrcwe3-16200567.pdf?src-supplier=Future+Electronics, Contact Plating=Tin, Depth=0.5mm, Features="Automotive AEC-Q200", Height=0.35mm, Item Type=Resistors, Lead Free=5697LeadFree, Length=1mm, Manufacturer Part Number=CRCW04025K23FKED, Number of Terminations=2, Packaging="Tape and Reel", Pins=2, Power Rating=63mW, Pricing="20000=0.00245 (USD)", Radiation Hardening=No, Reach SVHC Compliant=Unknown, RoHS=Yes, RoHS Compliant=Yes, Series=CRCW, Stock=10000, Supplier=Avnet, Technology="THICK FILM", Termination=SMD/SMT, Tolerance=1%, Voltage Rating (DC)=50V, Weight=2.3E-05oz, Width=0.02inch, Working Voltage=50V
R9A R9B R9C: library part SR0402FR-7T10KL, "RES 10K OHM 1% 1/5W 0402", LCSC Part Number=C854480, Manufacturer=Yageo, Supplier Part Number 1=YAG5815CT-ND, ComponentLink1Description=http://www.yageo.com/documents/recent/PYu-SR_D_F%20tol_RoHS_L_3.pdf?src-supplier=Digi-Key, ComponentLink1URL=http://www.yageo.com/documents/recent/PYu-SR_D_F%20tol_RoHS_L_3.pdf?src-supplier=Digi-Key, Manufacturer Part Number=SR0402FR-7T10KL, Pricing 1="1=0.56, 10=0.398, 100=0.2072, 1000=0.11156, 2500=0.10757, 5000=0.10598 (USD)", RoHS Compliant=Yes, Stock 1=7859, Supplier 1=Digi-Key
R12A R12B R12C: library part FRC0402F1334TS, "62.5mW Thick Film Resistors 50V ±100ppm/℃ ±1% 1.33MΩ 0402 Chip Resistor - Surface Mount ROHS", LCSC Part Number=C5713265, Manufacturer=FOJAN, Package=0402, ComponentLink1Description=LCSC, ComponentLink1URL=https://www.lcsc.com/product-detail/Chip-Resistor-Surface-Mount_FOJAN-FRC0402F1334TS_C5713265.html, Item Type=Resistor, Manufacturer Part Number=FRC0402F1334TS
R13A R13B R13C: library part ERJ-2RKF2700X, "RES SMD 270 OHM 1% 1/10W 0402", LCSC Part Number=C278588, Manufacturer=Panasonic, Voltage Rating (DC)=50V, ComponentLink1Description=https://datasheet.ciiva.com/11821/0900766b80f80784-11821240.pdf?src-supplier=Rs, ComponentLink1URL=https://datasheet.ciiva.com/11821/0900766b80f80784-11821240.pdf?src-supplier=Rs, ComponentLink2Description=https://datasheet.ciiva.com/46373/1678782-46373915.pdf?src-supplier=Element14, ComponentLink2URL=https://datasheet.ciiva.com/46373/1678782-46373915.pdf?src-supplier=Element14, ComponentLink3Description=https://datasheet.ciiva.com/46373/1678782-46373916.pdf?src-supplier=Element14, ComponentLink3URL=https://datasheet.ciiva.com/46373/1678782-46373916.pdf?src-supplier=Element14, ComponentLink4Description=https://datasheet.ciiva.com/16767/70260748-16767359.pdf?src-supplier=Allied+Electronics, ComponentLink4URL=https://datasheet.ciiva.com/16767/70260748-16767359.pdf?src-supplier=Allied+Electronics, ComponentLink5Description=https://datasheet.ciiva.com/7944/aoa0000ce2-7944940.pdf?src-supplier=Element14, ComponentLink5URL=https://datasheet.ciiva.com/7944/aoa0000ce2-7944940.pdf?src-supplier=Element14, ComponentLink6Description=https://datasheet.ciiva.com/22705/1678782-22705421.pdf?src-supplier=Element14, ComponentLink6URL=https://datasheet.ciiva.com/22705/1678782-22705421.pdf?src-supplier=Element14, ComponentLink7Description=https://datasheet.ciiva.com/7944/aoa0000ce2-7944606.pdf?src-supplier=Element14, ComponentLink7URL=https://datasheet.ciiva.com/7944/aoa0000ce2-7944606.pdf?src-supplier=Element14, ComponentLink8Description=https://datasheet.ciiva.com/24069/aoa0000ce2-24069133.pdf?src-supplier=Mouser, ComponentLink8URL=https://datasheet.ciiva.com/24069/aoa0000ce2-24069133.pdf?src-supplier=Mouser, ComponentLink9Description=https://datasheet.ciiva.com/9183/aoa0000ce2-9183598.pdf?src-supplier=Avnet, ComponentLink9URL=https://datasheet.ciiva.com/9183/aoa0000ce2-9183598.pdf?src-supplier=Avnet, ComponentLink10Description=https://datasheet.ciiva.com/43467/1678782-43467257.pdf?src-supplier=Farnell, ComponentLink10URL=https://datasheet.ciiva.com/43467/1678782-43467257.pdf?src-supplier=Farnell, ComponentLink11Description=https://datasheet.ciiva.com/5860/aoa0000ce2-5860650.pdf?src-supplier=Farnell, ComponentLink11URL=https://datasheet.ciiva.com/5860/aoa0000ce2-5860650.pdf?src-supplier=Farnell, ComponentLink12Description=https://datasheet.ciiva.com/9183/aoa0000ce2-9183566.pdf?src-supplier=Avnet, ComponentLink12URL=https://datasheet.ciiva.com/9183/aoa0000ce2-9183566.pdf?src-supplier=Avnet, ComponentLink13Description=https://datasheet.ciiva.com/16766/70260748-16766103.pdf?src-supplier=Allied+Electronics, ComponentLink13URL=https://datasheet.ciiva.com/16766/70260748-16766103.pdf?src-supplier=Allied+Electronics, ComponentLink14Description=https://datasheet.ciiva.com/30198/aoa0000ce2-30198389.pdf?src-supplier=Onlinecomponents.com, ComponentLink14URL=https://datasheet.ciiva.com/30198/aoa0000ce2-30198389.pdf?src-supplier=Onlinecomponents.com, Item Type=Resistors, Lead Free=5697LeadFree, Manufacturer Part Number=ERJ-2RKF2700X, Pricing="1=0.1, 10=0.015, 50=0.015, 100=0.009, 1000=0.008, 10000=0.004 (USD)", RoHS=Yes, Stock=141131, Supplier=Mouser
R14A R14B R14C: library part RC0402FR-07560RL, "RES 560 OHM 1% 1/16W 0402", Case Code (Imperial)=0402, Case Code (Metric)=1005, LCSC Part Number=C163460, Manufacturer=Yageo, Max Operating Temperature=155°C, Max Power Dissipation=63mW, Min Operating Temperature=-55°C, Package Quantity=1, Resistance Tolerance=1%, Resistor Type="Thick Film", Supplier Part Number=8872046, Temperature Coefficient=100ppm/°C, Voltage Rating=50V, Case/Package=0402, Category="Chip SMD Resistors", ComponentLink1Description=https://datasheet.ciiva.com/2453/pyu-r-int-thick-7-2453458.pdf?src-supplier=Digikey, ComponentLink1URL=https://datasheet.ciiva.com/2453/pyu-r-int-thick-7-2453458.pdf?src-supplier=Digikey, ComponentLink2Description=https://datasheet.ciiva.com/2453/pyu-r-int-thick-7-2453459.pdf?src-supplier=Digikey, ComponentLink2URL=https://datasheet.ciiva.com/2453/pyu-r-int-thick-7-2453459.pdf?src-supplier=Digikey, ComponentLink3Description=https://datasheet.ciiva.com/2453/pyu-r-int-thick-7-2453457.pdf?src-supplier=Digikey, ComponentLink3URL=https://datasheet.ciiva.com/2453/pyu-r-int-thick-7-2453457.pdf?src-supplier=Digikey, ComponentLink4Description=https://datasheet.ciiva.com/12558/pyu-rc0402-51-rohs-l-6-r-8721-12558383.pdf?src-supplier=Mouser, ComponentLink4URL=https://datasheet.ciiva.com/12558/pyu-rc0402-51-rohs-l-6-r-8721-12558383.pdf?src-supplier=Mouser, ComponentLink5Description=https://datasheet.ciiva.com/7850/1018594-7850042.pdf?src-supplier=Element14, ComponentLink5URL=https://datasheet.ciiva.com/7850/1018594-7850042.pdf?src-supplier=Element14, ComponentLink6Description=https://datasheet.ciiva.com/7850/1018594-7850043.pdf?src-supplier=Element14, ComponentLink6URL=https://datasheet.ciiva.com/7850/1018594-7850043.pdf?src-supplier=Element14, Construction=Rectangular, Depth=0.5mm, Features="Moisture Resistant", Height=0.016inch, Item Type=Resistor, Lead Free="Lead Free", Length=1mm, Manufacturer Part Number=RC0402FR-07560RL, Military Standard=Not, Number of Terminations=2, Packaging="Tape and Reel", Power Rating=63mW, Pricing="10000=0.0012, 100000=0.0011, 300000=0.0011, 1250000=0.001, 3000000=0.0009 (USD)", Reach SVHC Compliant=Unknown, RoHS=Yes, RoHS Compliant=Yes, Series=RC, Stock=1360000, Supplier="Future Electronics", Termination=SMD/SMT, Tolerance=1%, Width=0.02inch
R19A R19B R19C: library part RT0402BRD077K87L, "RES SMD 7.87KOHM 0.1% 1/16W 0402", Case Code (Imperial)=0402, Case Code (Metric)=1005, LCSC Part Number=C852920, Manufacturer=Yageo, Max Operating Temperature=155°C, Max Power Dissipation=63mW, Min Operating Temperature=-55°C, Package Quantity=10000, Power Rating=62.5mW, Temperature Coefficient=25ppm/°C, Tolerance=0.1%, Voltage Rating=50V, Case/Package=0402, ComponentLink1Description=https://datasheet.ciiva.com/2582/pyu-rt-1-to-0-05-rohs-l-4-2582499.pdf?src-supplier=Digikey, ComponentLink1URL=https://datasheet.ciiva.com/2582/pyu-rt-1-to-0-05-rohs-l-4-2582499.pdf?src-supplier=Digikey, ComponentLink2Description=https://datasheet.ciiva.com/12796/pyu-rt-1-to-0-05-rohs-l-4-12796502.pdf?src-supplier=Mouser, ComponentLink2URL=https://datasheet.ciiva.com/12796/pyu-rt-1-to-0-05-rohs-l-4-12796502.pdf?src-supplier=Mouser, ComponentLink3Description=https://datasheet.ciiva.com/46635/pyu-rt-1-to-0-05-rohs-l-5-46635069.pdf?src-supplier=Digikey, ComponentLink3URL=https://datasheet.ciiva.com/46635/pyu-rt-1-to-0-05-rohs-l-5-46635069.pdf?src-supplier=Digikey, Features="Moisture Resistant", Height=0.014inch, Item Type=Resistors, Lead Free="Lead Free", Length=0.039inch, Manufacturer Part Number=RT0402BRD077K87L, Number of Terminations=2, Packaging="Tape and Reel", Pricing="10=1.13, 100=0.981, 500=0.57, 2500=0.512, 5000=0.454, 10000=0.411, 50000=0.403, 100000=0.394 (SEK)", RoHS=Yes, RoHS Compliant=Yes, Series=RT, Stock=16247, Supplier=Farnell, Termination=SMD/SMT, Voltage Rating (DC)=50V, Weight=2.3E-05oz, Width=0.5mm
R24A R24B R24C: library part RC0402DR-07200KL, "RES 200K OHM 0.5% 1/16W 0402", Case/Package=0402, LCSC Part Number=C138077, Manufacturer=Yageo, Max Operating Temperature=155°C, Max Power Dissipation=63mW, Min Operating Temperature=-55°C, Resistance=200kR, Resistor Type="Thick Film", Supplier Part Number 1=603-RC0402DR-07200KL, Temperature Coefficient=100ppm/°C, Tolerance=0.5%, Category="Chip SMD Resistors", ComponentLink1Description=http://www.yageo.com.tw/exep/pages/download/literatures/PYu-R_INT-thick_7.pdf?src-supplier=Digi-Key, ComponentLink1URL=http://www.yageo.com.tw/exep/pages/download/literatures/PYu-R_INT-thick_7.pdf?src-supplier=Digi-Key, Features="Moisture Resistant", Height=0.016inch, Length=0.039inch, Manufacturer Part Number=RC0402DR-07200KL, Number of Terminations=2, Packaging="Tape and Reel", Pricing 1="1=0.13000, 10=0.07000, 50=0.07000, 100=0.02900, 1000=0.01300, 10000=0.00700 (USD)", RoHS=Yes, Supplier 1=Mouser, Width=0.02inch
R25A R25B R25C: library part RC0402FR-071KL, "RES 1K OHM 1% 1/16W 0402", Case Code (Imperial)=0402, Case Code (Metric)=1005, LCSC Part Number=C106235, Manufacturer=Yageo, Max Operating Temperature=155°C, Max Power Dissipation=63mW, Min Operating Temperature=-55°C, Power Rating=62.5mW, Resistance=1kR, Resistance Tolerance=1%, Resistor Type="Thick Film", Temperature Coefficient=100ppm/°C, Voltage Rating=50V, Case/Package=0402, Category="Chip SMD Resistors", ComponentLink1Description=https://datasheet.ciiva.com/11819/0900766b80c66297-11819477.pdf?src-supplier=RSComponents, ComponentLink1URL=https://datasheet.ciiva.com/11819/0900766b80c66297-11819477.pdf?src-supplier=RSComponents, ComponentLink2Description=https://datasheet.ciiva.com/7983/1018594-7983502.pdf?src-supplier=Element14, ComponentLink2URL=https://datasheet.ciiva.com/7983/1018594-7983502.pdf?src-supplier=Element14, ComponentLink3Description=https://datasheet.ciiva.com/22747/1018594-22747513.pdf?src-supplier=Element14, ComponentLink3URL=https://datasheet.ciiva.com/22747/1018594-22747513.pdf?src-supplier=Element14, ComponentLink4Description=https://datasheet.ciiva.com/12666/pyu-rc0402-51-rohs-l-6-r-12666741.pdf?src-supplier=Mouser, ComponentLink4URL=https://datasheet.ciiva.com/12666/pyu-rc0402-51-rohs-l-6-r-12666741.pdf?src-supplier=Mouser, ComponentLink5Description=https://datasheet.ciiva.com/7849/1018594-7849869.pdf?src-supplier=Element14, ComponentLink5URL=https://datasheet.ciiva.com/7849/1018594-7849869.pdf?src-supplier=Element14, ComponentLink6Description=https://datasheet.ciiva.com/7849/1018594-7849871.pdf?src-supplier=Element14, ComponentLink6URL=https://datasheet.ciiva.com/7849/1018594-7849871.pdf?src-supplier=Element14, ComponentLink7Description=https://datasheet.ciiva.com/17063/pyu-rc0402-51-rohs-l-6-r-17063193.pdf?src-supplier=Future+Electronics, ComponentLink7URL=https://datasheet.ciiva.com/17063/pyu-rc0402-51-rohs-l-6-r-17063193.pdf?src-supplier=Future+Electronics, Construction=Rectangular, Depth=0.5mm, Features="Moisture Resistant", Height=0.32mm, Item Type=Resistor, Lead Free="Lead Free", Length=1mm, Manufacturer Part Number=RC0402FR-071KL, Military Standard=Not, Number of Pins=2, Number of Terminations=2, Packaging="Tape and Reel", Pricing 1="10000=0.00085, 20000=0.00087, 40000=0.00084, 60000=0.00083, 80000=0.00079, 100000=0.00078, 1000000=0.00076 (USD)", Reach SVHC Compliant=Yes, RoHS=Yes, RoHS Compliant=Yes, Series=RC, Size Code=0402, Stock 1=13030000, Supplier 1=Avnet, Supplier Part Number 1=RC0402FR-071KL, Technology="THICK FILM", Termination=SMD/SMT, Tolerance=1%, Voltage Rating (DC)=50V, Width=0.5mm
R28: library part RC1206FR-7W1KL, "RES 1K OHM 1% 1/2W 1206", LCSC Part Number=C859155, Manufacturer=Yageo, Supplier Part Number 1=13-RC1206FR-7W1KLCT-ND, Category="Chip SMD Resistors", ComponentLink1Description=LCSC, ComponentLink1URL=https://www.lcsc.com/product-detail/Chip-Resistor-Surface-Mount_YAGEO-RC1206FR-7W1KL_C859155.html, Item Type=Resistor, Manufacturer Part Number=RC1206FR-7W1KL, Pricing 1="1=0.19000, 10=0.15700, 100=0.06150, 1000=0.02572, 2500=0.02358 (USD)", RoHS=Yes, RoHS Compliant=Yes, Stock 1=6215, Supplier 1=Digi-Key
TP1A TP1B TP1C: "Test Point ON", Item Type="Test Point", Manufacturer Part Number="TEST POINT 0.5mm Dia"
U1A U1B U1C: "STANDALONE 17-V, 3-A SINGLE CELL", LCSC Part Number=C3682611, Manufacturer="Texas Instruments", Item Type=IC, Manufacturer Part Number=BQ25306RTER, Pricing="1=2.27, 10=1.48, 50=1.48, 100=1.21, 1000=1.11, 10000=0.937 (USD)", RoHS=Yes, Stock=4465, Supplier=Mouser

## Free pads (board coordinates)
  round 11.81 smd far side: 3(2239,758)
  round 25 smd far side: 4(1344,759) 4(3123,758)
  round 20 smd far side: 4(2239,758)

## Via types
v1: diameter 15.75, hole 7.87, Top Layer to Bottom Layer, 119 vias

## Nets (pads, with @x,y where several pads share a name; then routed paths per layer and width w, separated by ;. In a path a pad name is that pad's centre, name@x,y a point inside that pad or via, vN(x,y) a via of type N, cw(c..) or ccw(c..) an arc to the next point about the centre after c; other vN are vias at no path point)
+12: C1A.2 C1B.2 C1C.2 C3.2 C4.2 C5.2 C19.1 F1.2 J5.1 LED4.1 U1A.1 U1B.1 U1C.1
BAT1A: C11A.2 C13A.2 C20A.2 J1A.2 L1A.2 R12A.2 U1A.10 | length 197.2
  Top Layer w10: U1A.10 v1@1492,826.04 ; C13A.2@1494.5,936 C13A.2@1505.11,925.39
  Bottom Layer w15: v1(1494.5,821) v1(1494.5,920.5)
BAT1B: C11B.2 C13B.2 C20B.2 J1B.2 L1B.2 R12B.2 U1B.10 | length 197.2
  Top Layer w10: U1B.10 v1@2387,825.04 ; C13B.2@2389.5,935 C13B.2@2400.11,924.39
  Bottom Layer w15: v1(2389.5,820) v1(2389.5,919.5)
BAT1C: C11C.2 C13C.2 C20C.2 J1C.2 L1C.2 R12C.2 U1C.10 | length 197.2
  Top Layer w10: U1C.10 v1@3271,825.04 ; C13C.2@3273.5,935 C13C.2@3284.11,924.39
  Bottom Layer w15: v1(3273.5,820) v1(3273.5,919.5)
EN1A: pad.4@1344,759 U1A.6 | length 18.4
  Top Layer w10: v1@1344.32,759.32 U1A.6@1344.32,777.76
  other v1: 1344,759
EN1B: pad.3 pad.4@2239,758 U1B.6 | length 18.4
  Top Layer w10: v1@2239.31,758.32 U1B.6@2239.31,776.76
  other v1: 2239,758
EN1C: pad.4@3123,758 U1C.6 | length 18.4
  Top Layer w10: v1@3123.31,758.32 U1C.6@3123.31,776.76
  other v1: 3123,758
FB_GND1A: R24A.1 U1A.8
FB_GND1B: R24B.1 U1B.8
FB_GND1C: R24C.1 U1C.8
GND: C1A.1 C1B.1 C1C.1 C3.1 C4.1 C5.1 C6A.1 C6B.1 C6C.1 C10A.2 C10B.2 C10C.2 C11A.1 C11B.1 C11C.1 C13A.1 C13B.1 C13C.1 C19.2 J1A.1 J1B.1 J1C.1 J4.2 J4.3 J6.1 Q2A.2 Q2B.2 Q2C.2 R1A.1 R1B.1 R1C.1 R19A.1 R19B.1 R19C.1 R28.1 U1A.11 U1A.12 U1A.17 U1B.11 U1B.12 U1B.17 U1C.11 U1C.12 U1C.17
  other v1: 2405,426.5 3289,426.5 1510,427.5 536,482.5 536,513 2565.5,689 3449.5,689 1670.5,690 2643.5,690 3527.5,690 1748.5,691 2684,731 3568,731 1789,732 1635,734.5 2530,733.5 3414,733.5 1224.5,785.5 2119.5,787 2992,790.5 2119,809.5 2681,811 3565,811 1224.5,811.5 1786,812 2526.5,812 2992,812.5 3410.5,812 1631.5,813 1375,814.5 2228,814 2270,813.5 3112,814 3154,813.5 1333,815 2118.5,833 2991,833 1223.5,834 1745.5,834.5 2249.5,834.5 2570.5,834.5 2640.5,833.5 3133.5,834.5 3454.5,834.5 3524.5,833.5 1354.5,835.5 1675.5,835.5 2448,846.5 3332,846.5 2479,847 3363,847 1518,848.5 1553,847.5 1584,848 2413,847.5 3297,847.5 1467.5,850.5 2362.5,849.5 3246.5,849.5 2228.5,856.5 2270.5,856.5 3112.5,856.5 3154.5,856.5 1333.5,857.5 1375.5,857.5 2446.5,873 2480,873 3330.5,873 3364,873 1468,874.5 1551.5,874 1585,874 2363,873.5 2412,874.5 3247,873.5 3296,874.5 1517,875.5 1237.5,926.5 2113,925.5 2132.5,925.5 2996,925.5 3016.5,925.5 1218,927 1308,1008.5 2203,1007.5 3087,1007.5 2167.5,1009 3051.5,1009 1272.5,1010 1309,1028.5 2204,1027.5 3088,1027.5 2166.5,1030 3050.5,1030 1271.5,1031
IND_SW1A: C2A.2 L1A.1 U1A.13 U1A.14
IND_SW1B: C2B.2 L1B.1 U1B.13 U1B.14
IND_SW1C: C2C.2 L1C.1 U1C.13 U1C.14
NetC2A_1: C2A.1 U1A.15 | length 3.8
  Top Layer w10: C2A.1@1345.32,931.32 C2A.1@1348,934
NetC2B_1: C2B.1 U1B.15 | length 3.8